# Altium PCB Step..._Breakout.PcbDoc (part 3 of 3)
Units mil, origin at the board's own origin, x right, y up, seen from the top; angles counter-clockwise.
Board outline 1609 x 1792 mil, 2 copper layers (Top Layer, Bottom Layer), stack 57 mil thick; 115 components, 101 nets, 437 pads, 201 vias.
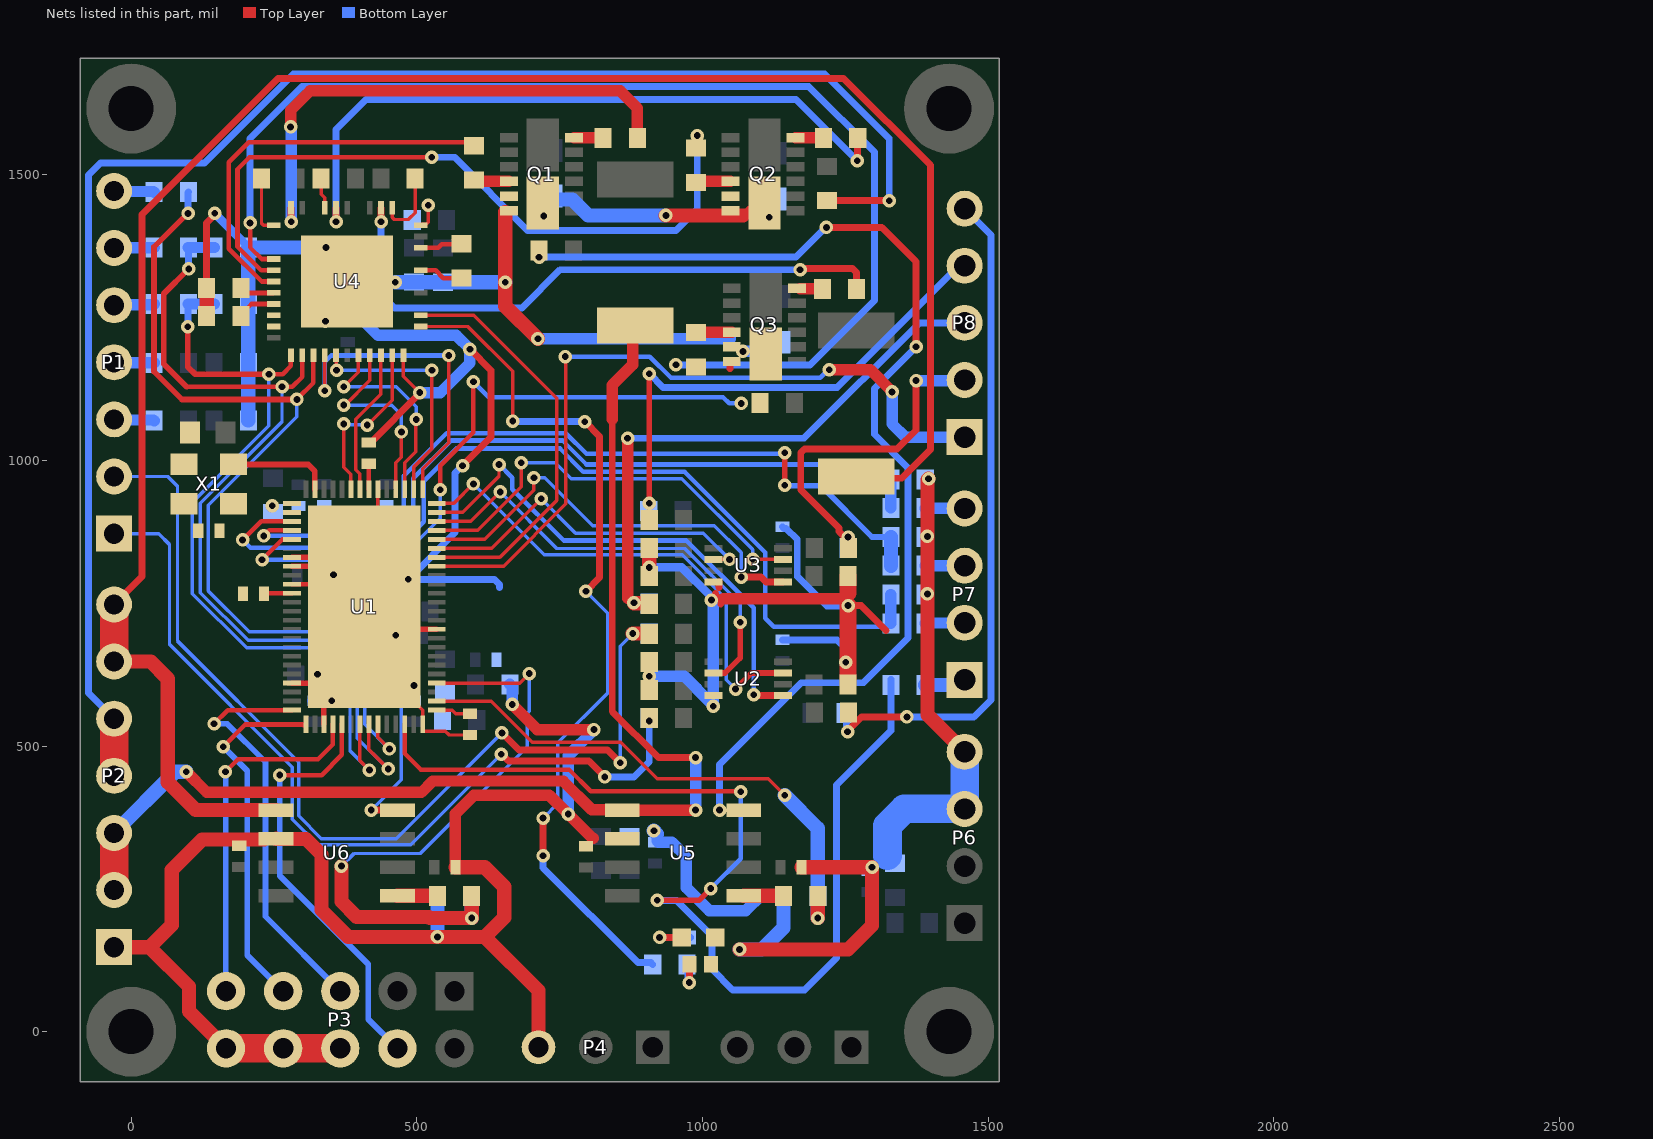
[diagram p2: the nets of this part, all layers, seen from the top]

## Via types
v1: diameter 23.62, hole 11.81, Top Layer to Bottom Layer, tented both sides, 201 vias

## Nets (pads, with @x,y where several pads share a name; then routed paths per layer and width w, separated by ;. In a path a pad name is that pad's centre, name@x,y a point inside that pad or via, vN(x,y) a via of type N, cw(c..) or ccw(c..) an arc to the next point about the centre after c; other vN are vias at no path point) (continued)
BRAKE_: P8.1 U1.31 | length 1332.3
  Top Layer w6: U1.31@534.57,814.87 651.87,814.87 761,924 761,1181 v1(760,1182)
  Top Layer w20: v1(1222,1159) 1293.98,1159 1332,1120.98 v1(1332,1120)
  Bottom Layer w6: v1@1220.57,1159 v1(1222,1159)
  Bottom Layer w8: v1(760,1182) 908,1182 945,1145 1206.57,1145 v1@1220.57,1159
  Bottom Layer w20: v1(1332,1120) 1332,1064.16 1355.16,1041 P8.1@1459,1041
CLK_: U1.51 X1.3 | length 159.4
  Top Layer w10: X1.3@199,993 310,993 321.39,981.61 U1.51@321.39,949.32
CPI_: C26.2 U4.27 | length 73.5
  Top Layer w8: U4.27@507,1372.48 537.48,1372.48 543.43,1378.43 C26.2@578.06,1378.43
CPO_: C26.1 U4.26 | length 76.7
  Top Layer w8: U4.26@507,1333.11 532.89,1333.11 546.57,1319.43 C26.1@578.06,1319.43
CTRL_EN: C38.1 R23.2 U1.55 | length 1467.7
  Top Layer w8: v1(195,861) 227.61,893.61 U1.55@281.43,893.61
  Bottom Layer w8: v1(195,861) 208.81,847.19 439.19,847.19 494,902 494,969 560,1035 755,1035 797,993 1306.5,993 1330,969.5 C38.1@1330,967 ; R23.2@1330,916.6 1330,947
  Bottom Layer w20: R23.2@1330,917 1330,947 C38.1@1330,967
CU_: C27.1 U4.1 | length 101.2
  Top Layer w6: C27.1@228,1494 228,1415.37 231.51,1411.85 U4.1@249.13,1411.85
CUR_U: C43.2 R30.1 U1.16 | length 955.6
  Top Layer w6: U1.16@534.57,578.65 630.35,578.65 702,507 857,507 921,443 1115,443 v1(1144,414)
  Top Layer w25: v1(1202,199) R30.1@1202,238
  Bottom Layer w25: v1(1144,414) 1202,356 C43.2@1202,238 v1(1202,199)
CUR_W: C46.2 R31.1 U1.18 | length 1090.6
  Top Layer w6: U1.18@534.57,610.14 680.14,610.14 v1(697,627)
  Top Layer w25: v1(368,290) 368,228 395,201 520.85,201 522.85,199 v1(596,199) R31.1@596,238
  Bottom Layer w6: v1(368,290) 390,312 506,312 693,499 693,556.93 697,560.93 v1(697,627)
  Bottom Layer w25: v1(596,199) C46.2@596,238
CV_: C47.1 U4.35 | length 54.2
  Top Layer w6: C47.1@332.5,1494 332.5,1466.5 338.69,1460.31 U4.35@338.69,1442.36
CW_: C48.1 U4.30 | length 123.4
  Top Layer w6: U4.30@456.8,1442.36 457,1442.17 457,1425.51 460.51,1422 485,1422 497,1434 C48.1@497,1494
DBG_SPI_MISO: P3.9 U1.4 | length 627.9
  Top Layer w8: v1(165,455) 187,477 327,477 352.88,502.88 U1.4@352.88,538.68
  Bottom Layer w10: v1(165,455) 165.5,454.5 165.5,71.5 P3.9@166,71
DBG_SPI_MOSI: P3.7 U1.1 | length 631.3
  Top Layer w8: v1(161,499) 199.85,537.85 300.5,537.85 ; U1.1@302.65,535.7 U1.1@305.64,538.68
  Bottom Layer w10: v1(161,499) 203,457 203,134 P3.7@266,71
DBG_SPI_SCK: P3.5 U1.76 | length 719.3
  Top Layer w8: v1(145,539) 168.9,562.9 U1.76@281.43,562.9
  Bottom Layer w10: v1(145,539) 168,539 235,472 235,202 P3.5@366,71
DIR_: C37.1 R22.2 U1.56 | length 1425.2
  Top Layer w8: v1(232,868) 241.86,877.86 U1.56@281.43,877.86
  Top Layer w10: v1(1144,1013.81) 1144.11,1013.7 1144.11,956.93 v1(1144.23,956.82)
  Bottom Layer w8: v1(232,868) 438,868 477,907 477,973 552,1048 761,1048 797,1012 1142.19,1012 v1(1144,1013.81)
  Bottom Layer w10: v1(1144.23,956.82) 1145.05,956 1207,956 1296.8,866.2 C37.1@1330,866.2
  Bottom Layer w25: R22.2@1330,815.8 C37.1@1330,866.2
DRV_EN: U1.32 U4.24 | length 728.8
  Top Layer w6: U4.24@507,1254.37 599.63,1254.37 745,1109 745,930 645.61,830.61 U1.32@534.57,830.61
DRV_FAULT: R25.2 U4.23 | length 1532.3
  Top Layer w6: U4.23@507,1234.68 589.32,1234.68 668,1156 v1(668,1069)
  Top Layer w12: v1(721,308) v1@721,373.03 ; v1(794,1068) 820,1042 820,795 v1(796,771)
  Bottom Layer w6: v1(721,374) 747,400 747,506 834,593 834,733 v1(796,771)
  Bottom Layer w12: v1(668,1069) 668.5,1068.5 793.5,1068.5 v1(794,1068) ; v1(721,308) 721,287 887.03,120.97 910.03,120.97 R25.2@913,118
ENC.ENC_A: U1.35 U3.7 | length 763
  Top Layer w6: U1.35@534.57,877.86 606.88,877.86 683,953.98 v1(683,996) ; v1@1085,827 1085.16,826.84 U3.7@1141.02,826.84
  Bottom Layer w6: v1(683,996) 742,996 770,968 964.03,968 1087.8,844.23 1087.8,827.2 v1(1088,827)
ENC.ENC_B: U1.34 U3.5 | length 764.8
  Top Layer w6: U1.34@534.57,862.11 619.11,862.11 705,948 v1(705,970)
  Top Layer w12: v1(1068,796) 1102.82,796 1111.35,787.47 U3.5@1141.02,787.47
  Bottom Layer w6: v1(705,970) 724,970 808,886 1021,886 1068,839 v1(1068,796)
ENC.ENC_N: U1.33 U3.2 | length 621.2
  Top Layer w6: U1.33@534.57,846.36 631.38,846.36 v1(718.01,932.99) ; U3.2@1018.98,826.84 v1(1047.38,826.84)
  Bottom Layer w6: v1(718.01,932.99) 718.01,932.8 777.81,873 1001.22,873 v1(1047.38,826.84)
ENC_A#: P8.4 R7.1 R8.1 | length 906.2
  Top Layer w6: R8.1@907,896 v1(907,925)
  Top Layer w10: v1(907,925) v1(907,1152)
  Bottom Layer w12: v1(907,1152) 931,1128 1235.96,1128 1448.96,1341 P8.4@1459,1341
ENC_B#: P8.3 R9.1 R10.1 | length 1008.5
  Top Layer w20: 869,759 v1(869,1039)
  Top Layer w25: v1@880,750 906,750 R10.1@907,749
  Bottom Layer w12: v1(869,1039) 1178,1039 1380,1241 P8.3@1459,1241 ; v1(880,751) 902,751 903,750 R9.1@907,750
ENC_IN.ENC_N#: P8.2 R11.1 R12.1 | length 575.1
  Top Layer w12: v1(1255,866) 1249.08,866 1239,876.08 1239,882 1172,949 1172,1012.97 1179.03,1020 1341,1020 1374,1053 v1(1374,1140)
  Bottom Layer w12: P8.2@1458.5,1140.5 P8.2@1459,1141
  Bottom Layer w20: v1(1374,1140) P8.2@1458,1140
GND: C1.2 C2.2 C3.2 C4.2 C5.2 C6.2 C7.2 C8.2 C9.2 C10.2 C11.1 C12.1 C13.1 C14.1 C15.1 C16.1 C17.2 C18.1 C19.1 C20.1 C21.2 C22.2 C23.1 C24.2 C25.2 C28.1 C29.1 C30.2 C32.2 C33.2 C34.2 C35.2 C36.2 C37.2 C38.2 C39.2 C40.2 C41.2 C42.2 C43.1 C44.2 C45.2 C46.1 C49.2 C50.2 C51.2 LED1.2 LED2.2 P2.1 P3.6 P3.8 P3.10 P4.3 P6.3 P6.4 Q1.5 Q1.6 Q1.14 Q2.5 Q2.6 Q2.14 Q3.5 Q3.6 Q3.14 R14.1 R27.1 R29.1 U1.3 U1.14 U1.24 U1.44 U1.53 U1.54 U1.59 U1.60 U1.62 U1.73 U1.77 U2.4 U3.4 U4.8 U4.9 U4.21 U4.38 U5.2 U6.2 X1.2 | length 10383.9
  Top Layer w6: U1.44@431.62,949.32 431.62,767.62 U1.77@408,744 408,703.57 408,665.26 503.43,569.83 503.57,569.83 510.36,563.04 U1.14@510.36,538.68 510.36,527.66 511.69,526.33 549.67,526.33 556.5,519.5 C11.1@593,519.5 ; U4.21@476.49,1184.49 476.49,1147.51 v1(505,1119)
  Top Layer w8: U1.62@281.43,783.37 U1.77@368.63,783.37
  Top Layer w10: U1.73@281.43,610.14 314.57,610.14 U1.77@337.13,632.7 ; U1.60@281.43,814.87 U1.77@337.13,814.87 ; U1.59@281.43,830.61 321.39,830.61 U1.77@337.13,814.87 ; U1.3@337.13,538.68 U1.77@337.13,632.7 ; U1.77@408,703.57 U1.77@337.13,632.7 ; U1.24@534.57,704.63 447.37,704.63 U1.77@408,744 368.63,783.37 U1.77@337.13,814.87
  Top Layer w12: C28.1@132,1302 132,1415.86 146,1429.86 v1(146,1433) ; C12.1@419.73,1031.73 505,1117 v1(505,1119) ; v1(580,991) 630,1041 630,1158 v1(593,1195) ; Q1.6@655,1435.14 657.27,1437.41 Q1.6@661,1437.41 ; 1023,765 1023,767.5 ; 1028.72,777.72 U3.4@1028.72,787.38 ; 1032,748.81 1032,754 1036,758 ; 1048,1160.65 1048,1164 ; 1070.98,1429 Q2.14@1082.5,1440.52 ; 1246,758 v1@1255,749 ; C16.1@1250,608 1250.5,608.5 1250.5,646.5 v1(1251,647) ; 1255,768 v1@1255,749 ; 1321.5,702.5 1278,746 v1(1255,746) v1@1255,749
  Top Layer w20: v1(247,921) v1@247,922 ; C44.2@567.5,288 567.5,381.5 600,414 732,414 v1(765,381) 807,339 809,339 ; v1(667,573) 711,529 v1(810,529) ; 1036,758 1246,758
  Top Layer w25: P2.1@-30,148 32,148 ; C29.1@132,1253 C28.1@132,1302 ; P3.10@166,-29 101,36 101,79 32,148 ; U6.2@232.5,336.5 124.5,336.5 71,283 71,187 32,148 ; U6.2@253.7,338 254.39,337.31 305.91,337.31 333,310.22 333,213 380,166 619,166 ; C44.2@567.5,288 619,288 653,254 653,200 619,166 ; Q1.6@655,1435.14 v1(655,1312) 655,1270 v1(712,1213) ; P4.3@713,-27 713,72 619,166 ; C19.1@907,798 v1(907,812.81) C18.1@907,847 ; v1(936,1429) 1070.98,1429 ; v1(1065,144) 1255,144 1297,186 v1(1297,288) C41.2@1173.5,288 ; v1(1395.81,968) 1394,966.19 v1(1394,867.2) v1(1394,766.4) 1394,555 P6.4@1459,490
  Top Layer w30: C16.1@1255,608.5 v1(1255,746) ; 1255,768 C20.1@1255,798
  Top Layer w50: P3.10@166,-29 P3.8@266,-29 P3.6@366,-29
  Bottom Layer w10: C5.2@494.61,579.5 494.81,579.69 494.81,605.81 v1(495,606)
  Bottom Layer w12: C35.2@194.28,1384.5 196,1384.5 205,1375.5 C35.2@205,1373 ; v1(340,1244) 349,1244 349.5,1244.5 C25.2@379,1244.5 ; v1(580,991) 567,978 567,874 v1(485,792) 636,792 645,783 645,778 ; C17.2@1140,686 1236,686 1251,671 v1(1251,647) ; C21.2@1140,884 1143,881 1146.5,881 1166,861.5 1166,797 1218,745 1254,745 v1(1255,746)
  Bottom Layer w15: v1@146,1432.78 C35.2@194.28,1384.5 ; v1(907,812.81) 963.87,812.81 1014.06,762.61 1014.06,757.36 v1(1015.71,755.71)
  Bottom Layer w20: C25.2@379,1244.5 406.5,1244.5 432,1219 569,1219 v1(593,1195) 592.98,1170.78 541.2,1119 v1(505,1119) ; R14.1@663,608 667.31,603.69 v1@667.31,573.69 ; v1(712,1213) 1049,1213 ; v1(765,381) 765,483.02 810,528.02 v1(810,529) ; v1(907,622.5) 968.5,622.5 990.02,600.98 990.02,599.96 1019,570.98 v1(1019,570) 1019,751.45 1015.71,754.73 v1(1015.71,755.71) ; v1@920.5,346.14 920.5,334.29 923,331.79 946.21,331.79 972,306 972,252 1012,212 1076,212 1103,239 C43.1@1145,239 ; v1(1071,1191) 1092,1191 C51.2@1100.5,1199.5
  Bottom Layer w25: C32.2@205,1070 C33.2@205,1171 C34.2@205,1274 C35.2@205,1373 v1(341,1373) ; C2.2@321,579.5 v1(351,579.5) ; v1(326,626) 346,626 C8.2@348,624 ; C6.2@327.5,800 v1(354,800) ; v1(462,1312) C30.2@546,1312 v1(655,1312) ; v1(536,166) C46.1@536,238 ; v1(722,1428) 722,1451 C49.2@722,1460 ; C49.2@725,1463 731.02,1456.98 772.02,1456.98 800,1429 v1(936,1429) ; v1@915,351.64 v1@920.5,346.14 ; v1(915,352) v1@917,350 ; v1(1065,144) 1104,144 1142,182 C43.1@1142,238 ; C51.2@1100.5,1199.5 1116.5,1199.5 C51.2@1124,1207 ; v1(1117,1426) C50.2@1117,1458
  Bottom Layer w50: R29.1@1324,308 1324,360.71 1353.29,390 P6.3@1459,390 P6.4@1459,490
  other v1: 463,694
HALL_IN.HALL_UX#: P1.2 R1.1 R2.1 | length 1752.7
  Top Layer w12: v1(649,523) 679,493 834,493 v1(855.99,470.99)
  Top Layer w25: v1(878,697) R2.1@906,697
  Bottom Layer w6: P1.2@-30,972 64,972 81,955 81,684 293,472 293,378 333,338 464,338 v1(649,523) ; v1(855.99,470.99) 856,675 v1(878,697)
  Bottom Layer w12: v1(878,697) R1.1@907,697
HALL_IN.HALL_V#: P1.1 R3.1 R4.1 | length 1488.2
  Top Layer w12: v1(648,486) 648.84,486 660.84,474 801,474 v1(829,446)
  Bottom Layer w6: P1.1@-30,872 48,872 67,853 67,678 282,463 282,372 327,327 489,327 v1(648,486)
  Bottom Layer w12: v1(829,446) 880,446 907,473 v1(907,544) R3.1@907,549
HALL_IN.HALL_WY#: P8.5 R5.1 R6.1 | length 1188.7
  Top Layer w12: v1(1254,525) 1254,526.36 1278.64,551 v1(1358,551)
  Bottom Layer w12: R5.1@1250,558 1252,556 1252,527 v1(1254,525) ; v1(1358,551) 1475,551 1505,581 1505,1395 P8.5@1459,1441
HALL_UX: U1.38 U2.7 | length 863.6
  Top Layer w6: U1.38@534.57,925.1 565.09,925.1 v1(598.99,959.01)
  Top Layer w10: v1(1058,600) 1085.84,627.84 U2.7@1141.02,627.84
  Bottom Layer w6: v1(598.99,959.01) 723,835 964.44,835 1042,757.44 1042,616 v1(1058,600)
HALL_V: U1.37 U2.5 | length 921.1
  Top Layer w6: U1.37@534.57,909.35 580.35,909.35 643.78,972.78 643.78,992.78 v1(644,993)
  Top Layer w12: v1(1090,590) 1091.43,588.57 1140.93,588.57 U2.5@1141.02,588.47
  Bottom Layer w8: v1(644,993) 667,970 667,950 757,860 971.97,860 1090,741.97 v1(1090,590)
HALL_WY: U1.36 U2.2 | length 786.5
  Top Layer w6: U1.36@534.57,893.61 594.61,893.61 v1(646,945)
  Top Layer w10: U2.2@1018.98,627.84 1039.49,627.84 1066,654.36 v1(1066,717)
  Bottom Layer w6: v1(646,945) 745,846 969,846 1066,749 v1(1066,717)
HSU_: R32.1 U4.37 | length 904.3
  Top Layer w12: U4.37@279.64,1442.36 279.82,1442.18 279.82,1418.18 v1(280,1418)
  Top Layer w20: v1(279,1584) 279,1613 313,1647 856,1647 886,1617 R32.1@886,1565
  Bottom Layer w20: v1(280,1418) 280,1582.02 279.69,1582.33 279.69,1582.69 v1@280,1583
HSV_: R35.1 U4.34 | length 1204.3
  Top Layer w12: v1@358.38,1418.36 U4.34@358.38,1442.36 ; v1(1271,1525) 1271.5,1525.5 1271.5,1564.5 R35.1@1272,1565
  Bottom Layer w12: v1(358.56,1418.18) 358.56,1579.56 411,1632 1164,1632 v1(1271,1525)
HSW_: R37.1 U4.31 | length 1054.8
  Top Layer w12: v1@437.12,1418.36 U4.31@437.12,1442.36 ; v1(1171,1334) 1173.22,1336.22 1262.97,1336.22 1270,1329.19 R37.1@1270,1300
  Bottom Layer w12: v1(437.3,1418.18) 437.3,1290.7 461,1267 684,1267 751,1334 v1(1171,1334)
LSU_: R33.2 U4.5 | length 701.4
  Top Layer w6: U4.5@243.13,1313.43 244.55,1312 247.55,1315 U4.5@249.13,1313.43
  Top Layer w8: U4.5@243.13,1313.43 228.57,1313.43 171,1371 171,1522 206,1557 594,1557 R33.2@600,1551
LSV_: R36.2 U4.4 | length 1226.9
  Top Layer w8: U4.4@249.13,1333.11 227.27,1333.11 186,1374.38 186,1510 207,1531 v1(526,1531)
  Bottom Layer w12: v1(526,1531) 566.04,1531 694.04,1403 954,1403 991,1440 v1(991,1569)
LSW_: R38.2 U4.3 | length 2073.3
  Top Layer w8: v1(208,1416) 208,1373 228.2,1352.8 U4.3@249.13,1352.8
  Bottom Layer w12: v1(208,1416) 208,1564 299,1655 1186,1655 1301,1540 1301,1280 1188,1167 954.02,1167 v1(953.51,1167.51)
NetC11_2: C11.2 U1.15 | length 61.1
  Top Layer w6: U1.15@534.57,562.9 562.1,562.9 568.5,556.5 C11.2@593,556.5
NetC12_2: C12.2 U1.45 | length 45.1
  Top Layer w8: U1.45@415.87,949.32 C12.2@415.87,994.37
NetC13_2: C13.2 U1.63 | length 49.2
  Top Layer w6: C13.2@232.5,767 C13.2@233.12,767.62
  Top Layer w8: C13.2@233.12,767.62 U1.63@281.43,767.62
NetC23_2: C23.2 FB1.2 X1.1 X1.4
NetC28_2: C28.2 U4.6 | length 60.3
  Top Layer w8: C28.2@192,1302 200.7,1293.3 U4.6@248.68,1293.3
NetC29_2: C29.2 U4.7 | length 67.3
  Top Layer w8: C29.2@192,1253 192,1255.5 210.56,1274.06 U4.7@249.13,1274.06
NetC31_1: C31.1 U4.29 | length 44.9
  Top Layer w6: U4.29@507,1411.85 509,1413.85 516.49,1413.85 520,1417.37 v1(520,1447)
NetLED1_1: LED1.1 R24.1 | length 93
  Top Layer w12: v1(925,165) LED1.1@963.47,165
  Bottom Layer w12: v1(925,165) R24.1@979.5,165
NetLED2_1: LED2.1 R25.1 | length 64.8
  Top Layer w12: v1@977,87 977.15,87.15 977.15,117.85 LED2.1@977.3,118
  Bottom Layer w12: R25.1@973,118 975,116 975,88 v1(977,86)
NetP1_3: P1.3 R15.2 | length 70.8
  Bottom Layer w20: P1.3@-30,1072 -29,1071 39,1071 R15.2@40,1070
NetP1_4: P1.4 R16.2 | length 70.4
  Bottom Layer w20: P1.4@-30,1172 -29.5,1171.5 39.5,1171.5 R16.2@40,1171
NetP1_5: P1.5 R17.2 | length 70.8
  Bottom Layer w20: P1.5@-30,1272 -29,1273 39,1273 R17.2@40,1274
NetP1_6: P1.6 R18.2 | length 70.4
  Bottom Layer w20: P1.6@-30,1372 -29.5,1372.5 39.5,1372.5 R18.2@40,1373
NetP1_7: P1.7 R19.2 | length 70.8
  Bottom Layer w20: P1.7@-30,1472 -29,1471 39,1471 R19.2@40,1470
NetP7_1: P7.1 R20.1 | length 72.7
  Bottom Layer w25: R20.1@1390,607 1390.17,607.17 1450.17,607.17 P7.1@1459,616
NetP7_2: P7.2 R21.1 | length 69.4
  Bottom Layer w20: R21.1@1390,715 1390.5,715.5 1458.5,715.5 P7.2@1459,716
NetP7_3: P7.3 R22.1 | length 69.1
  Bottom Layer w20: R22.1@1390,815.8 1390.1,815.9 1458.9,815.9 P7.3@1459,816
NetP7_4: P7.4 R23.1 | length 69.2
  Bottom Layer w20: R23.1@1390,916.6 1390.3,916.3 1458.7,916.3 P7.4@1459,916
NetQ1_4: Q1.4 R33.1 | length 62
  Top Layer w20: R33.1@600,1491 602.41,1488.59 Q1.4@661,1488.59
NetQ1_12: Q1.12 R32.2 | length 51
  Top Layer w20: Q1.12@775.17,1565.36 775.35,1565.18 825.82,1565.18 R32.2@826,1565
NetQ2_4: Q2.4 R36.1 | length 60.7
  Top Layer w20: R36.1@989,1487 990.59,1488.59 Q2.4@1049,1488.59
NetQ2_12: Q2.12 R35.2 | length 49
  Top Layer w20: Q2.12@1163.17,1565.36 1163.35,1565.18 1211.82,1565.18 R35.2@1212,1565
NetQ3_4: Q3.4 R38.1 | length 62.5
  Top Layer w20: R38.1@989,1224 989.25,1224.25 1051.06,1224.25 Q3.4@1051.31,1224.5
NetQ3_12: Q3.12 R37.2 | length 39
  Top Layer w20: Q3.12@1171.23,1300.63 1209.37,1300.63 R37.2@1210,1300
NetR13_1: R13.1 RT1.2
NetR30_2: R30.2 U5.5 | length 69.7
  Top Layer w25: U5.5@1072.3,238 R30.2@1142,238
NetR31_2: R31.2 U6.5 | length 69.7
  Top Layer w25: U6.5@466.3,238 R31.2@536,238
SPI.SPI_MISO: R19.1 U1.9 U4.13 | length 1649.4
  Top Layer w6: v1@98.5,1432.5 v1(99.5,1432.5) ; U1.9@431.62,538.68 431.62,515.38 v1(452,495)
  Top Layer w8: v1(290,1107) 319.01,1136.01 U4.13@319.01,1184.49
  Top Layer w10: v1@98.5,1432.5 40,1374 40,1156 89,1107 v1(290,1107)
  Bottom Layer w6: v1(290,1107) 290,1077 135,922 135,771.53 206.53,700 361,700 409,652 409,538 v1(452,495)
  Bottom Layer w12: v1(99.5,1432.5) 99.5,1469.5 R19.1@100,1470
SPI.SPI_MOSI: C35.1 R18.1 U1.8 U4.12 | length 1617.3
  Top Layer w6: U1.8@415.87,538.68 415.87,494.13 v1(450,460)
  Top Layer w8: 97,1129 282,1129 299.32,1146.32 U4.12@299.32,1184.49
  Top Layer w10: 97,1129 57,1169 57,1292 v1(100.5,1335.5)
  Bottom Layer w6: v1(264,1129) 264,1067.97 121,924.97 121,768.56 204.56,685 355.7,685 396,644.7 396,514 v1(450,460)
  Bottom Layer w12: R18.1@100,1373 100.5,1372.5 v1(100.5,1335.5)
  Bottom Layer w20: R18.1@100,1373 C35.1@145,1373
SPI.SPI_SCK: C34.1 R17.1 U1.7 U4.11 | length 1419.5
  Top Layer w6: U1.7@400.13,538.68 400.13,474.87 v1(417,458)
  Top Layer w8: v1(241,1151) 265,1151 279.64,1165.64 U4.11@279.64,1184.49
  Top Layer w10: v1(99,1234) 99,1164 112,1151 v1(241,1151)
  Bottom Layer w6: v1(241,1151) 241,1060.53 107,926.53 107,767 202,672 353.14,672 383,642.14 383,492 v1(417,458)
  Bottom Layer w12: v1(99,1234) 99.5,1234.5 99.5,1273.5 R17.1@100,1274
  Bottom Layer w20: R17.1@100,1274 C34.1@145,1274
STATUS_: R20.2 R24.2 U1.12 | length 1924.9
  Top Layer w8: U1.12@478.87,538.68 478.87,487.13 507,459 766.41,459 804.41,421 1066,421 v1(1067,420)
  Top Layer w10: v1(921,230) 994,230 v1(1014.73,250.73)
  Bottom Layer w8: v1(1014.73,250.73) 1067,303 v1(1067,420)
  Bottom Layer w12: v1(921,230) 955,230 1013.5,171.5 1013.5,168 R24.2@1016.5,165 1016.5,109.5 1053,73 1179,73 1235,129 1235,432 1330,527 R20.2@1330,617
STEP_: C36.1 R21.2 U1.57 | length 1541.9
  Top Layer w8: v1(229,826.38) 264.4,861.78 281.09,861.78 U1.57@281.43,862.11
  Bottom Layer w8: v1(229,826.38) 445.38,826.38 512,893 512,964 569,1021 750.62,1021 791.62,980 969,980 1110,839 1110,724 1124.81,709.19 1319,709.19 R21.2@1330,720.19
  Bottom Layer w20: R21.2@1330,715 1330,728 C36.1@1330,765.4
TRG_: P3.4 U1.5 | length 741
  Top Layer w8: v1(260,449.31) 333.31,449.31 368.63,484.63 U1.5@368.63,538.68
  Bottom Layer w10: v1(260,449.31) 260,273 415,118 415,22 P3.4@466,-29
U_: P2.2 P2.3 R34.1 U5.1 | length 2159.9
  Top Layer w12: 842,1072 842,561 923,480 v1(988,480)
  Top Layer w20: v1(96.5,455) 132.5,419 508,419 528,439 756,439 806.31,388.69 U5.1@859.01,388.69 ; 842,1072 842,1132 878,1168 878,1232.05 R34.1@882,1236.05 ; U5.1@859.7,388 v1(988,388)
  Top Layer w50: P2.2@-30,248 P2.3@-30,348
  Bottom Layer w20: v1@988,397 v1(988,480)
  Bottom Layer w25: P2.3@-30,348 77,455 v1(96.5,455)
U_SENSE: SB1.2 U5.8 | length 1934.4
  Top Layer w12: v1(714,1356) SB1.2@714,1368 ; v1(1217,1408) 1314,1408 1374,1348 v1(1374,1199)
  Bottom Layer w12: v1(714,1356) 1164,1356 v1@1217.29,1409.29 ; v1(1030,388) 1030,468 1173,611 1282,611 1360,689 1360,987 1301,1046 1301,1126 v1(1374,1199)
UH_: U1.39 U4.14 | length 588.6
  Top Layer w6: v1@338.69,1122 U4.14@338.69,1184.49 ; U1.39@510.36,949.32 510.36,985.36 556,1031 v1(556,1183.86)
  Bottom Layer w8: v1@338.69,1122 338.69,1172.69 349.86,1183.86 v1(556,1183.86)
  other v1: 339,1122
UL_: U1.40 U4.15 | length 415.7
  Top Layer w6: U4.15@358.38,1184.49 358.94,1183.93 358.94,1158.56 v1(359.5,1158) ; U1.40@494.61,949.32 494.61,988.61 526.37,1020.37 v1(526.37,1158)
  Bottom Layer w6: v1(359.5,1158) v1(526.37,1158)
V_: P2.4 P2.5 SB3.2 | length 2810.8
  Top Layer w12: SB3.2@1218,1455 v1(1327,1455)
  Top Layer w50: P2.4@-30,448 P2.5@-30,548
  Bottom Layer w12: P2.5@-30,548 -75,593 -75,1500 -54,1521 128,1521 284,1677 1214,1677 1327,1564 v1(1327,1455)
VH_: U1.41 U4.17 | length 360.7
  Top Layer w6: v1(372,1129) 397.75,1154.75 U4.17@397.75,1184.49 ; U1.41@478.87,949.32 478.87,996.12 498,1015.25 498,1071 v1(499,1072)
  Bottom Layer w6: v1(372,1129) 464,1129 499,1094 v1(499,1072)
VL_: U1.42 U4.18 | length 350.4
  Top Layer w6: v1(372,1097) 374.23,1097 417.43,1140.2 U4.18@417.43,1184.49 ; U1.42@463.12,949.32 463.12,996.12 473,1006 v1(473,1050.09)
  Bottom Layer w6: v1(372,1097) 456,1097 473,1080 v1(473,1050.09)
W_: P2.6 P2.7 R39.1 U6.1 | length 3492.2
  Top Layer w12: P2.7@-30,748 19,797 19,1431 257,1669 1247,1669 1399,1517 1399,1019 1349,969 1272.05,969 R39.1@1269,972.05
  Top Layer w25: P2.6@-30,648 34,648 64,618 64,437 113,388 U6.1@253.7,388
  Top Layer w50: P2.6@-30,648 P2.7@-30,748
W_SENSE: SB2.2 U6.8 | length 1390.6
  Top Layer w8: v1(541,949) 541,991 599,1049 v1(599,1138)
  Top Layer w12: v1(420.01,388.01) U6.8@466.3,388
  Bottom Layer w6: v1(420.01,388.01) 473,441 473,600 433,640 433,791 541,899 v1(541,949) ; v1@1066.02,1100.66 v1@1068.34,1100.66
  Bottom Layer w8: v1(599,1138) 626,1111 1036,1111 1047,1100 v1(1068,1100)
WH_: U1.46 U4.19 | length 256.4
  Top Layer w6: U1.46@400.13,949.32 400.13,976.87 393,984 393,1072 437.12,1116.12 U4.19@437.12,1184.49
WL_: U1.47 U4.20 | length 303.3
  Top Layer w6: v1@372,1065 372,988 384.38,975.62 U1.47@384.38,949.32 ; v1(413,1062) 456.8,1105.8 U4.20@456.8,1184.49
  Bottom Layer w6: v1(372,1064) 373,1063 412,1063 v1(413,1062)
pads on no net: P3.2 U1.10 U1.11 U1.21 U1.48 U1.49 U1.58 U1.64 U1.65 U1.66 U1.67 U1.68 U1.69 U1.70 U1.71 U1.74 U4.2 U5.4 U6.4

## Polygon pours and split planes (outlines as drawn)
GND on Top Layer "GND_L01_P000" (hatched 45Degree grid 20 track 8, remove dead copper, pour order 0): -36,1655 1468,1655 1468,-37 -36,-37
GND on Bottom Layer "GND_L02_P001" (hatched 45Degree grid 20 track 8, remove dead copper, pour order 1): -38,1663 1466,1663 1466,-29 -38,-29

## Other copper
Top Layer:
  rectangle net NetC31_1: 508.06,1407 532,1454.43
  rectangle net U_SENSE: 698,1341 731,1388
  rectangle net GND: 193,904 267,943
  rectangle net GND: 1000,740 1042,795
  rectangle net U_SENSE: 1016,376 1104,402
  rectangle net GND: 1232,589 1403,816
  rectangle net ENC_IN.ENC_N#: 1233,827 1275,882.08
  rectangle net HALL_IN.HALL_WY#: 1230,512 1372,582
  region net LSW_: 1013,1144 1013,1186 937,1186 937,1144
  rectangle net W_SENSE: 1056,1082 1119,1125
  rectangle net 3A$: 1175,778 1215,866
  rectangle net 3A%: 1170,539 1210,627
  rectangle net GND: 1002,557 1035,597
  rectangle net GND: 889,579 927,665
  rectangle net ENC_A#: 890,876 922,939
  rectangle net GND: 145,754 211,785
  rectangle net 5V: 434,273 539,303
  rectangle net GND: 433,1248 477,1394
  rectangle net LSV_: 971,1532 1007,1597
  rectangle net BMW_: 420,1473 452,1515
  rectangle net BMV_: 372.86,1429.88 401.86,1454.88
  rectangle net BMU_: 294,1430 323,1455
  rectangle net GND: 234,1229 477,1260
  rectangle net GND: 145,757 171,943
  rectangle net NetC23_2: 69,861 133,1070
  rectangle net 3V3: 272,937 310,973
  rectangle net GND: 169,904.35 507,926
  rectangle net GND: 643,1410.05 746,1471
  rectangle net GND: 1033.31,1145.95 1136.31,1206.91
  rectangle net GND: 1031,1403 1134,1471
  rectangle net BMU_: 778.48,1460 949,1523
  rectangle net BMU_: 759.69,1350 793.69,1548.09
  rectangle net BMV_: 1147.69,1429.09 1181.69,1548.09
  rectangle net +VM: 1033.54,1507.66 1137.69,1599.09
  rectangle net +VM: 645.54,1507.66 749.69,1617
  rectangle net +VM: 1035.85,1243.56 1140,1335
  rectangle net BMW_: 1165.48,1196 1336,1259
  rectangle net BMW_: 1150,1082 1184,1284
  rectangle net DBG_SPI_MOSI: 292,524 309,551.7
  rectangle net GND: 175,314.5 290,358.5
  rectangle net GND: 778,312 933,368
  rectangle net GND: 998,103 1079,181
Bottom Layer:
  rectangle net GND: 1049,1180 1159,1227
  rectangle net 5V: 952,518 1022,549
  rectangle net 5V: 952,677 990,769
  rectangle net NetC31_1: 477,1404 532,1468
  rectangle net +VM: 538,1357 599,1439
  rectangle net +VM: 475,1357 595,1388
  rectangle net 3V3: 422,983 461,1033
  rectangle net NetR13_1: 529,526 569,607
  rectangle net GND: 253,911 463,931
  rectangle net 5V: 500,678 579,756
  rectangle net GND: 630,587 675,798
  rectangle net AGPI_B: 581,587 620,651
  rectangle net AGPI_B: 530,637 620,673
  rectangle net GND: 447,676 492,756
  rectangle net GND: 228,887 294,931
  rectangle net 3V3: 226,946 461,998
  rectangle net GND: 851,321 933,368
  rectangle net 2V5: 801,264 936,309
  rectangle net GND: 1278,272 1358,332
  rectangle net ADC_VM: 1248,169 1358,261

## Silkscreen, mask and mechanical layers (free items; w line width, h text height)
Top Overlay:
  text "*" at 428,1026.09 h75
  text "*" at 198,841.09 h75
  text "*" at 174.61,728.45 h75
  text "#" at 853.4,678.4 h55
  text "#" at 1281,540.59 h55
  text "#" at 854.4,531.4 h55
  text "*" at 639,517.09 h75
  text "*" at 807.33,319.68 h75
  text "*" at 200,317.09 h75
  text "*" at 612,251.09 h75
  text "*" at 1218,251.09 h75
  text "STATUS" at 721,142 h60
  text "FAULT" at 721,90 h60
Bottom Overlay:
  drawing of 3080 lines, arcs and shapes, not listed
  text "Note:" at 433.14,1645.05 h75
  text "* >> 0.1uF" at 433.14,1587.17 h70
  text "# >> 4.7K" at 438.14,1523.35 h70
  text "*" at 579,1385.09 h75
  text "*" at 464,1206.09 h75
  text "*" at 517,1205.09 h75
  text "ZERO CARBON FOOTPRINT" at 1064.98,1005.19 h31.56
  text "#" at 880,894.59 h55
  text "*" at 1128,878.59 h75
  text "*" at 435,854.09 h75
  text "*" at 326.39,853.45 h75
  text "*" at 281.39,852.45 h75
  text "#" at 1303,830.59 h55
  text "*" at 249.39,764.45 h75
  text "#" at 881,731.59 h55
  text "*" at 1128,680.09 h75
  text "#" at 880.6,679.4 h55
  text "#" at 494,662.41 h55 r180
  text "*" at 430,653.09 h75
  text "*" at 659,612.72 h75
  text "#" at 715,590.59 h55
  text "#" at 1164,539.59 h55
  text "#" at 880.6,531.4 h55
  text "*" at 309,473.09 h75
  text "*" at 482,473.09 h75
  text "*" at 1280,273.09 h75
  text "*" at 905,226.09 h75
  text "#" at 837,223.59 h55
  text "#" at 886.6,224.4 h55
Board Outline:
  lines w10: -89,-88 -89,1704 1520,1704 1520,-88 1148.83,-88 -89,-88
Fab:
  drawing of 354 lines, arcs and shapes, not listed
  text "Layer" at 2065,1772.83 h60
  text "Name" at 2474.91,1772.83 h60
  text "Material" at 3404.66,1772.83 h60
  text "Thickness" at 4264.43,1772.83 h60
  text "Constant" at 4914.26,1772.83 h60
  text "Board Layer Stack" at 5484.12,1772.83 h60
  text "Top Overlay" at 2474.91,1652.83 h60
  text "Top Solder" at 2474.91,1532.83 h60
  text "Solder Resist" at 3404.66,1532.83 h60
  text "3.00mil" at 4264.43,1532.83 h60
  text "3.5" at 4914.26,1532.83 h60
  text "1" at 2065,1412.83 h60
  text "Top Layer" at 2474.91,1412.83 h60
  text "10.00mil" at 4264.43,1412.83 h60
  text "Dielectric 1" at 2474.91,1292.83 h60
  text "FR-4" at 3404.66,1292.83 h60
  text "37.00mil" at 4264.43,1292.83 h60
  text "4.8" at 4914.26,1292.83 h60
  text "2" at 2065,1172.83 h60
  text "Bottom Layer" at 2474.91,1172.83 h60
  text "10.00mil" at 4264.43,1172.83 h60
  text "Bottom Solder" at 2474.91,1052.83 h60
  text "Solder Resist" at 3404.66,1052.83 h60
  text "3.00mil" at 4264.43,1052.83 h60
  text "3.5" at 4914.26,1052.83 h60
  text "Bottom Overlay" at 2474.91,932.83 h60
Drill Drawing:
  circle w10: c13.62,2746.83 r33.33
  lines w10: -19.71,2430.17 -3.04,2430.17 13.62,2413.5 30.29,2430.17 46.96,2430.17 30.29,2446.83 46.96,2463.5 30.29,2463.5 13.62,2480.17 -3.04,2463.5 -19.71,2463.5 -3.04,2446.83 -19.71,2430.17 ; -19.71,2563.5 46.96,2563.5 46.96,2630.17 -19.71,2630.17 -19.71,2563.5 ; -19.71,2863.5 13.62,2880.17 46.96,2863.5 30.29,2896.83 46.96,2930.17 13.62,2913.5 -19.71,2930.17 -3.04,2896.83 -19.71,2863.5
  lines w15: -79.5,2368.5 10701.5,2368.5 ; -79.5,2968.5 10701.5,2968.5 ; 471.38,2218.5 471.38,3118.5 ; 1071.22,2218.5 1071.22,3118.5 ; 2170.9,2218.5 2170.9,3118.5 ; 2676.77,2218.5 2676.77,3118.5 ; 3410.57,2218.5 3410.57,3118.5 ; 4910.13,2218.5 4910.13,3118.5 ; 5499.97,2218.5 5499.97,3118.5 ; 6245.77,2218.5 6245.77,3118.5 ; 7135.52,2218.5 7135.52,3118.5 ; 7989.28,2218.5 7989.28,3118.5 ; 9322.89,2218.5 9322.89,3118.5 ; -79.5,2218.5 10701.5,2218.5 10701.5,3118.5 -79.5,3118.5 -79.5,2218.5
  text "Symbol" at 10.5,3013.5 h72
  text "Count" at 516.38,3013.5 h72
  text "Hole Size" at 1116.22,3013.5 h72
  text "Plated" at 2215.9,3013.5 h72
  text "Hole Type" at 2721.77,3013.5 h72
  text "Drill Layer Pair" at 3455.57,3013.5 h72
  text "Via/Pad" at 4955.13,3013.5 h72
  text "Pad Shape" at 5544.97,3013.5 h72
  text "Template" at 6290.77,3013.5 h72
  text "Description" at 7180.52,3013.5 h72
  text "Hole Tolerance (+)" at 8034.28,3013.5 h72
  text "Hole Tolerance (-)" at 9367.89,3013.5 h72
  text "4" at 516.38,2863.5 h60
  text "78.74mil (2.000mm)" at 1116.22,2863.5 h60
  text "NPTH" at 2215.9,2863.5 h60
  text "Round" at 2721.77,2863.5 h60
  text "Top Layer - Bottom Layer" at 3455.57,2863.5 h60
  text "Pad" at 4955.13,2863.5 h60
  text "Rounded" at 5544.97,2863.5 h60
  text "c400hn200" at 6290.77,2863.5 h60
  text "13" at 516.38,2713.5 h60
  text "37.40mil (0.950mm)" at 1116.22,2713.5 h60
  text "PTH" at 2215.9,2713.5 h60
  text "Round" at 2721.77,2713.5 h60
  text "Top Layer - Bottom Layer" at 3455.57,2713.5 h60
  text "Pad" at 4955.13,2713.5 h60
  text "(Mixed)" at 5544.97,2713.5 h60
  text "(Mixed)" at 6290.77,2713.5 h60
  text "30" at 516.38,2563.5 h60
  text "35.43mil (0.900mm)" at 1116.22,2563.5 h60
  text "PTH" at 2215.9,2563.5 h60
  text "Round" at 2721.77,2563.5 h60
  text "Top Layer - Bottom Layer" at 3455.57,2563.5 h60
  text "Pad" at 4955.13,2563.5 h60
  text "(Mixed)" at 5544.97,2563.5 h60
  text "(Mixed)" at 6290.77,2563.5 h60
  text "201" at 516.38,2413.5 h60
  text "11.81mil (0.300mm)" at 1116.22,2413.5 h60
  text "PTH" at 2215.9,2413.5 h60
  text "Round" at 2721.77,2413.5 h60
  text "Top Layer - Bottom Layer" at 3455.57,2413.5 h60
  text "Via" at 4955.13,2413.5 h60
  text "Rounded" at 5544.97,2413.5 h60
  text "v60h30m0mx0(1)" at 6290.77,2413.5 h60
  text "248 Total" at 516.38,2263.5 h60

## Dimensions
-89,-88 to -89,1704 on Dimension
1520,-88 to -89,-88 on Dimension